# Altium PCB charging_device.PcbDoc (part 3 of 3)
Units mm, origin at the board's own origin, x right, y up, seen from the top; angles counter-clockwise.
Board outline 200.72 x 85.24 mm, 2 copper layers (Top Layer, Bottom Layer); 199 components, 123 nets, 612 pads, 55 vias.
Unrouted connection lines stored in the file: 5.
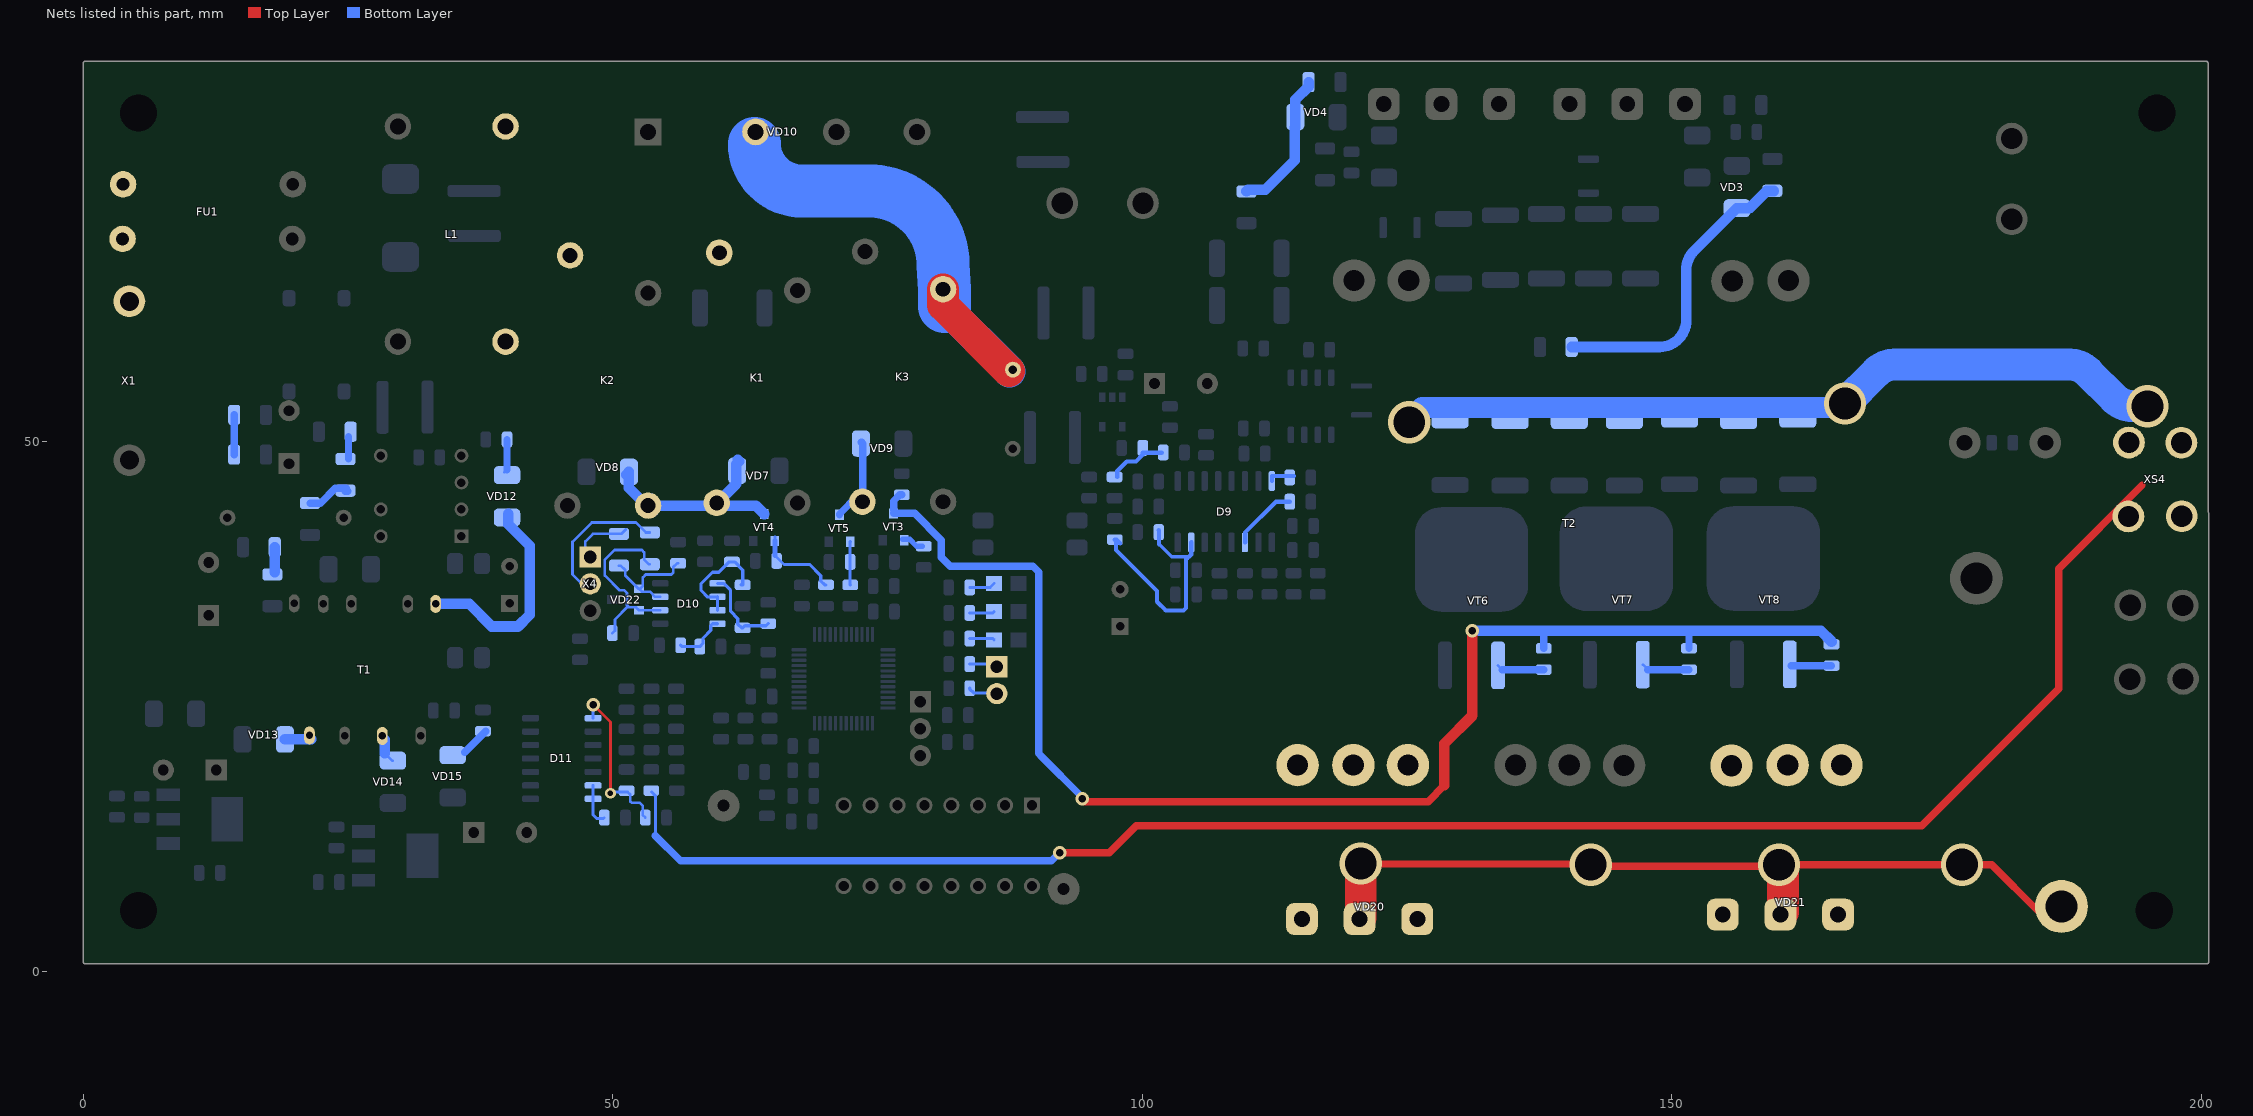
[diagram p3: the nets of this part, all layers, seen from the top]

## Via types
v1: diameter 1.27, hole 0.711, Top Layer to Bottom Layer, 36 vias
v2: diameter 4, hole 3, Top Layer to Bottom Layer, 15 vias
v3: diameter 1.016, hole 0.508, Top Layer to Bottom Layer, 2 vias
v4: diameter 4, hole 2, Top Layer to Bottom Layer, 1 vias
v5: diameter 2, hole 1, Top Layer to Bottom Layer, 1 vias

## Nets (pads, with @x,y where several pads share a name; then routed paths per layer and width w, separated by ;. In a path a pad name is that pad's centre, name@x,y a point inside that pad or via, vN(x,y) a via of type N, cw(c..) or ccw(c..) an arc to the next point about the centre after c; other vN are vias at no path point) (continued)
NetD9_8: D9.8 R71.1 | length 2.6
  Bottom Layer w0.4: D9.8@112.25,46.275 112.25,46.752 R71.1@114.333,46.752
NetD9_11: D9.11 R73.1 | length 6.4
  Bottom Layer w0.4: D9.11@109.71,40.475 109.728,40.493 109.728,41.402 112.649,44.323 R73.1@113.935,44.323
NetD9_15: D9.15 R66.1 R67.2 | length 22.2
  Bottom Layer w0.3: 101.598,40.314 102.796,39.116 104.403,39.116
  Bottom Layer w0.4: R66.1@97.939,40.372 97.575,40.736 R66.1@97.409,40.736 97.536,40.609 97.536,39.751 101.4,35.887 101.4,34.871 102.235,34.036 103.898,34.036 104.152,34.29 104.152,38.865 104.264,38.977 ; R67.2@101.569,41.628 101.598,41.599 101.598,40.314 ; 104.403,39.116 104.63,39.343 D9.15@104.63,40.475 D9.15@104.648,40.493
NetD10_1: D10.1 R28.2 R82.2 | length 8.2
  Bottom Layer w0.3: D10.1@59.892,36.609 60.469,36.609 61.129,35.949 61.129,33.967 61.813,33.283 61.813,32.766 62.177,32.402 R82.2@62.272,32.402 62.479,32.608 64.479,32.608 R28.2@64.685,32.815
NetD10_2: D10.2 D10.3 R26.2 R81.2 | length 10.4
  Bottom Layer w0.3: D10.3@59.892,34.069 D10.2@59.892,35.339 59.867,35.314 58.97,35.314 58.335,35.949 58.335,36.578 59.419,37.661 60.027,37.661 61.006,38.641 R81.2@61.256,38.641 61.506,38.641 62.288,37.859 62.288,36.482 R26.2@62.105,36.482
NetD10_4: D10.4 R27.2 R83.2 | length 5
  Bottom Layer w0.3: R83.2@56.414,30.767 56.541,30.64 R27.2@58.224,30.64 58.521,30.937 58.521,31.428 59.258,32.165 59.258,32.628 59.43,32.799 D10.4@59.892,32.799
NetD10_6: D10.6 R77.2 R78.2 VD22.2 | length 17.5
  Bottom Layer w0.254: R78.2@49.969,31.91 50.207,32.148 50.207,33.205 51.452,34.45 ; R77.2@53.509,38.411 53.41,38.411 52.974,38.847 52.974,39.529 52.747,39.756 50.165,39.756 49.257,38.848 49.257,37.357 50.665,35.949 51.096,35.949 51.35,35.695 51.35,34.552 51.452,34.45 ; D10.6@54.492,34.069 VD22.2@52.493,34.069 52.214,34.348 51.554,34.348 51.452,34.45
NetD10_7: D10.7 R79.1 R80.1 VD22.1 | length 10.9
  Bottom Layer w0.254: R79.1@50.588,38.284 50.754,38.284 51.19,37.848 51.19,37.328 52.417,36.101 VD22.1@52.493,36.101 ; D10.7@54.492,35.339 54.005,35.339 53.522,35.821 52.773,35.821 VD22.1@52.493,36.101 ; R80.1@56.176,38.505 56.081,38.505 55.717,38.141 55.717,37.624 55.549,37.455 53.12,37.455 52.849,37.183 52.849,36.38 52.569,36.101 VD22.1@52.493,36.101
NetD11_8: D11.8 R47.1 R50.2 | length 15.5
  Top Layer w0.254: v1(48.141,25.151) 49.784,23.508 v3(49.784,16.794)
  Bottom Layer w0.254: D11.8@48.141,23.881 v1(48.141,25.151) ; v3(49.784,16.794) 49.902,16.912 51.414,16.912 51.657,16.669 51.657,16.029 51.806,15.88 52.557,15.88 52.823,15.614 52.823,14.741 R47.1@53.081,14.483
NetD11_13: D11.13 D11.14 R44.1 | length 4
  Bottom Layer w0.254: D11.13@48.141,17.531 D11.14@48.141,16.261 48.141,14.759 48.493,14.407 49.132,14.407 R44.1@49.207,14.483
NetFU1_1: FU1.1 X1.1
NetK1_2: K1.2 L1.2
NetK2_2: K2.2 L1.3 | length 0.8
  Bottom Layer w0.254: K2.2@45.72,67.977 K2.2@46.545,67.977
NetK3_1: K3.1 VD9.1 VT5.3 | length 7.8
  Bottom Layer w0.7: VT5.3@71.416,43.086 71.416,43.162 73.078,44.824 73.596,45.342 73.596,45.355 73.596,49.816 73.485,49.927 VD9.1@73.517,49.927
NetK3_3: K3.3 R14.2 VD10.2 | length 49.2
  Top Layer w0.254: K3.3@81.198,64.389 ccw(c83.606,64.389) 81.904,62.686
  Top Layer w3: K3.3@81.198,64.389 81.198,62.884 R14.2@87.414,56.667
  Bottom Layer w3: 81.318,62.774 R14.2@87.477,56.616
  Bottom Layer w5: VD10.2@63.373,78.147 ccw(c67.86,78.147) 67.86,73.66 74.217,73.66 cw(c74.217,66.679) 81.198,66.679 81.318,64.395 81.318,62.774
NetL2_1: L2.1 VD20.2 VD21.2 | length 76.4
  Top Layer w0.254: VD20.2@120.534,4.913 VD20.2@120.65,5.029 ; v2(160.147,10.033) v2@160.528,9.652 ; VD21.2@160.274,5.331 VD21.2@160.528,5.585
  Top Layer w0.7: v2@120.704,10.106 v2@142.313,10.106 ; v2@142.513,9.906 v2@159.385,9.906 ; v2@160.264,10.043 171.694,10.043 v2@177.409,10.043 ; v2(177.419,10.052) 180.219,10.052 L2.1@184.556,5.715
  Top Layer w1.778: v2(120.65,10.16) v2@120.704,10.106 ; v2@142.313,10.106 v2(142.367,10.052) v2@142.513,9.906 ; v2@160.147,10.16 v2@160.264,10.043 ; v2@177.409,10.043 v2(177.419,10.052)
  Top Layer w3: VD20.2@120.65,5.029 v2(120.65,10.16) ; VD21.2@160.528,5.585 v2@160.528,9.652
  Bottom Layer w0.254: VD20.2@120.534,4.913 VD20.2@120.65,5.029 ; v2(160.147,10.033) 160.679,10.033 v2@160.933,9.779
NetR2_1: R2.1 R6.2 VD4.2 | length 13.7
  Bottom Layer w1: R2.1@109.855,73.625 109.998,73.768 111.617,73.768 114.413,76.564 114.413,79.628 114.464,79.679 VD4.2@114.464,80.645 114.464,82.276 115.721,83.533 R6.2@115.721,83.947
NetR3_1: R3.1 R5.2 VD3.2 | length 28.9
  Bottom Layer w1: R3.1@140.565,58.928 148.844,58.928 ccw(c148.844,61.468) 151.384,61.468 151.384,66.21 cw(c153.924,66.21) 152.128,68.006 VD3.2@156.163,72.041 157.353,72.041 158.972,73.66 R5.2@159.639,73.66
NetR15_1: R15.1 R16.2 | length 2.7
  Bottom Layer w0.254: R15.1@17.859,37.457 R15.1@18.089,37.687
  Bottom Layer w1: R15.1@18.089,37.687 R16.2@18.089,40.025
NetR17_1: R17.1 R18.2 | length 3.8
  Bottom Layer w0.7: R17.1@14.248,48.768 R18.2@14.248,52.527
NetR19_1: R19.1 R20.2 | length 2.1
  Bottom Layer w0.7: R20.2@25.049,48.395 R19.1@25.049,50.451
NetR20_1: R20.1 R21.2 | length 4.3
  Bottom Layer w0.7: R21.2@21.415,44.188 22.407,44.188 23.794,45.575 R20.1@24.844,45.575 ; R20.1@24.717,45.297 R20.1@24.995,45.297
NetR22_1: R22.1 VD12.1 | length 3.2
  Bottom Layer w0.254: VD12.1@39.781,47.117 VD12.1@40.019,47.355
  Bottom Layer w0.7: VD12.1@40.019,47.355 R22.1@40.019,50.197
NetR23_1: R23.1 VD15.1 | length 2.8
  Bottom Layer w0.7: VD15.1@36.014,20.648 R23.1@38.003,22.638
NetR29_2: R29.2 X2.1 | length 2.7
  Bottom Layer w0.3: R29.2@83.719,28.989 86.021,28.989 X2.1@86.275,28.735
NetR30_2: R30.2 X2.2 | length 2.8
  Bottom Layer w0.3: R30.2@83.719,26.703 83.719,26.626 84.083,26.262 86.208,26.262 X2.2@86.275,26.195
NetR33_1: R33.1 VD18.1 | length 2.4
  Bottom Layer w0.3: R33.1@83.719,33.815 85.894,33.815 VD18.1@86.021,33.942
NetR34_1: R34.1 VD19.1 | length 2.4
  Bottom Layer w0.3: R34.1@83.719,31.402 85.894,31.402 VD19.1@86.021,31.275
NetR35_1: R35.1 VD17.1 | length 2.5
  Bottom Layer w0.254: R35.1@83.719,36.228 85.64,36.228 VD17.1@86.021,36.609
NetR36_1: R36.1 R38.1 VT4.1 | length 8.1
  Bottom Layer w0.254: R38.1@65.32,39.24 66.169,38.391 68.606,38.391 ; VT4.1@65.32,40.622 VT4.1@65.32,41.021
  Bottom Layer w0.3: 68.606,38.391 69.65,37.347 69.65,36.83 70.014,36.466 R36.1@70.146,36.466
  Bottom Layer w0.5: R38.1@65.32,39.24 VT4.1@65.32,40.622
NetR37_2: R37.2 VT3.1 | length 2.2
  Bottom Layer w0.5: VT3.1@77.368,40.783 77.538,40.783 78.037,40.783 78.704,40.116 R37.2@79.248,40.116
NetR39_2: R39.2 R48.2 R49.2 R51.2 VT3.3 | length 130
  Top Layer w0.4: v1(94.361,16.256) v1@94.615,16.002
  Top Layer w0.7: v1@94.615,16.002 127,16.002 128.524,17.526
  Top Layer w1: 128.524,17.526 128.524,21.463 131.191,24.13 v1(131.191,32.131)
  Bottom Layer w0.254: 151.511,32.131 151.638,32.004
  Bottom Layer w0.7: VT3.3@76.522,43.213 78.509,43.213 81.026,40.696 81.026,39.08 81.864,38.243 89.69,38.243 90.249,37.684 90.249,20.574 ; VT3.3@76.522,43.492 76.522,44.384 77.111,44.974 R39.2@77.295,44.974 ; 90.424,20.32 94.361,16.383 v1(94.361,16.256) ; R48.2@137.922,30.464 137.922,32.131 ; R49.2@151.638,30.464 151.638,32.004
  Bottom Layer w1: v1(131.191,32.131) 137.922,32.131 151.511,32.131 164.084,32.131 R51.2@165.1,31.115
NetR41_1: R41.1 R42.1 VT5.1 | length 4.1
  Bottom Layer w0.3: R41.1@72.432,36.466 72.416,36.482 R42.1@72.416,38.641 72.416,40.53 VT5.1@72.432,40.546
NetR48_1: R48.1 VT6.1 | length 4.5
  Bottom Layer w0.254: VT6.1@133.608,28.862 VT6.1@134.005,28.464
  Bottom Layer w0.7: VT6.1@134.005,28.464 R48.1@137.922,28.464
NetR49_1: R49.1 VT7.1 | length 4.6
  Bottom Layer w0.254: VT7.1@147.28,28.937 VT7.1@147.753,28.464
  Bottom Layer w0.7: VT7.1@147.753,28.464 R49.1@151.638,28.464
NetR51_1: R51.1 VT8.1 | length 4
  Bottom Layer w0.254: VT8.1@161.163,28.956 VT8.1@161.274,28.845
  Bottom Layer w0.7: VT8.1@161.274,28.845 R51.1@165.1,28.845
NetR52_1: R52.1 R53.1 R54.1 R55.1 R56.1 R57.1 R58.1 R59.1 XS4.1 | length 241.5
  Top Layer w0.7: v1(92.202,11.176) 96.901,11.176 99.441,13.716 173.609,13.716 186.563,26.67 186.563,37.999 194.425,45.861
  Bottom Layer w0.254: v2(125.222,51.816) 125.222,52.001 125.672,52.451 v2@126.434,53.213 ; v2@165.989,53.213 v2(166.37,53.594) ; v2@193.584,53.34 v2(194.945,53.34)
  Bottom Layer w0.3: R59.1@53.652,16.912 53.662,16.912 54.025,16.548 54.025,12.791
  Bottom Layer w0.7: 54.025,12.791 56.402,10.414 91.44,10.414 v1(92.202,11.176)
  Bottom Layer w2: v2(125.222,51.816) 125.222,52.375 v2@125.595,52.748 ; v2@126.434,53.213 v2@165.989,53.213
  Bottom Layer w3: v2(166.37,53.594) 169.309,56.533 cw(c171.105,54.737) 171.105,57.277 187.579,57.277 cw(c187.579,54.824) 189.313,56.559 191.788,54.084 ccw(c193.584,55.88) v2@193.584,53.34
NetR62_1: R62.1 R63.2 R64.2 | length 5.6
  Bottom Layer w0.4: R62.1@97.646,46.656 97.646,47.213 98.548,48.116 99.406,48.116 100.045,48.755 100.045,48.938 R64.2@101.855,48.938
NetR77_1: R77.1 X4.2 | length 13.1
  Bottom Layer w0.254: X4.2@47.413,36.476 47.193,36.696 46.976,36.696 46.207,37.465 46.207,40.535 48.033,42.361 52.184,42.361 53.134,41.411 R77.1@53.509,41.411
NetR79_2: R79.2 X4.1 | length 5.9
  Bottom Layer w0.254: X4.1@47.413,39.016 47.413,40.562 48.135,41.284 R79.2@50.588,41.284 50.808,41.284 R79.2@51.243,41.72
NetT1_1: T1.1 VD12.2 | length 20.6
  Bottom Layer w1: T1.1@33.274,34.671 36.454,34.671 38.585,32.54 41.049,32.54 42.164,33.655 42.164,40.164 40.132,42.196 VD12.2@40.132,43.162
NetT1_7: T1.7 VD13.1 | length 2.5
  Bottom Layer w1: VD13.1@19.048,21.876 T1.7@21.519,21.876
NetT1_9: T1.9 VD14.1 | length 2.4
  Bottom Layer w0.254: T1.9@28.402,21.926 T1.9@28.472,21.856 ; VD14.1@28.472,20.564 29.172,19.864 VD14.1@29.24,19.864
  Bottom Layer w1: VD14.1@28.472,20.564 T1.9@28.472,21.856
NetT2_1:  | length 0.2
  Bottom Layer w0.254: 114.833,4.369 114.833,4.521
NetT2_2: T2.1 T2.2 T2.3 VD20.1 VD20.3
NetT2_9: T2.9 T2.10 T2.11 VD21.1 VD21.3
RELAY2: K1.1 K2.4 VD7.1 VD8.1 VT4.3 | length 22.8
  Top Layer w0.7: K2.4@53.709,44.54 K2.4@54.038,44.212
  Bottom Layer w0.254: K2.4@53.525,44.74 53.652,44.613 K2.4@53.911,44.355 ; K1.1@60.064,44.172 K1.1@60.064,44.437
  Bottom Layer w0.7: K1.1@60.064,44.172 K1.1@60.278,43.958
  Bottom Layer w1: VD8.1@51.272,46.874 VD8.1@51.53,47.133 51.53,45.625 53.498,43.657 53.799,43.356 53.799,43.958 59.621,43.958 59.968,44.304 60.1,44.437 61.662,45.998 61.662,47.851 61.96,48.149 VD7.1@61.813,48.295 ; K2.4@53.652,44.597 K2.4@53.652,44.613 ; K1.1@60.314,43.958 63.509,43.958 VT4.3@64.304,43.162
pads on no net: D3.3 D3.6 D5.4 D6.4 D7.2 D7.3 D7.4 D7.5 D7.6 D7.10 D7.14 D7.15 D7.20 D7.21 D7.22 D7.33 D7.35 D7.36 D11.5 D11.6 D11.7 T1.5 VD3. VD4. VD5. VD6. VD7. VD8. VD9. VD11. VD12. VD13. VD14. VD15. VD16. VD20. VD21. VT1. VT2. VT6. VT7. VT8. X1.2

## Polygon pours and split planes (outlines as drawn)
NetC44_2 on Top Layer "NETC44_2_L01_P126" (solid, pour order 126): 134.617,39.384 154.092,39.384 ccw(c154.092,61.078) 168.034,44.457 ccw(c161.297,51.195) 170.51,48.767 cw(c181.131,45.968) 171.402,51.066 cw(c175.814,48.754) 175.814,53.735 cw(c175.814,50.756) 177.92,52.862 178.694,52.089 cw(c176.819,50.213) 179.471,50.213 cw(c173.671,50.576) 177.78,46.466 ccw(c183.84,40.406) 175.27,40.406 175.27,26.6 cw(c171.56,26.6) 173.99,23.796 cw(c172.538,25.471) 172.538,23.255 127.162,23.255 cw(c126.468,26.379) 124.179,24.142 cw(c126.396,26.308) 124.381,28.663 126.405,30.395 ccw(c123.87,33.358) 127.742,32.896 cw(c135.064,32.024)
NetR52_1 on Top Layer "NETR52_1_L01_P124" (solid, pour order 124): 125.73,53.594 160.825,53.594 ccw(c160.825,59.009) 164.654,55.18 cw(c166.406,53.428) 166.406,55.906 cw(c166.406,53.421) 168.163,51.665 cw(c151.665,68.162) 151.665,44.831 131.287,44.831 cw(c131.287,53.381) 125.241,47.335 cw(c129.273,51.367) 123.571,51.367 cw(c125.771,51.367) 125.389,53.534
NetR52_1 on Top Layer "NETR52_1_L01_P122" (solid, pour order 122): 191.77,49.022 191.77,52.426 cw(c194.97,52.426) 194.97,55.626 195.426,55.626 cw(c195.426,49.123) 197.352,55.334 cw(c196.228,51.707) 200.025,51.707 200.025,41.634 cw(c198.015,41.634) 198.015,39.624 193.798,39.624 cw(c193.798,43.303) 190.119,43.303 190.119,45.036 cw(c195.756,45.036)
NetK1_2 on Top Layer "NETK1_2_L01_P106" (solid, pour order 106): 41.944,83.121 ccw(c40.137,79.735) 39.175,83.451 ccw(c40.233,79.359) 36.006,79.359 ccw(c43.376,79.359) 38.165,74.147 ccw(c41.845,77.828) 41.845,72.623 44.325,72.623 cw(c44.326,62.661) 49.604,71.11 ccw(c60.875,89.15) 53.187,69.316 55.302,68.497 cw(c54.687,66.909) 55.608,68.341 57.595,67.063 cw(c56.15,64.815) 57.797,66.92 ccw(c61.238,71.321) 59.731,65.941 ccw(c60.235,67.741) 62.1,67.628 62.12,67.963 ccw(c61.973,68.158) 62.168,68.305 62.168,68.718 ccw(c56.241,68.72) 62.12,69.474 ccw(c57.483,68.881) 58.724,73.388 ccw(c53.729,55.248) 54.519,74.047 cw(c54.89,82.851) 51.497,74.719 ccw(c20.947,1.55) 50.448,75.148 cw(c51.689,78.24) 49.679,75.583 cw(c59.671,88.791) 46.588,78.636 ccw(c28.663,64.724)
NetFU1_1 on Top Layer "NETFU1_1_L01_P104" (solid, pour order 104): 1.27,76.104 ccw(c2.19,75.184) 0.889,75.184 0.889,63.669 ccw(c4.595,63.669) 1.974,61.049 ccw(c3.033,62.107) 3.033,60.61 ccw(c3.033,64.25) 5.607,61.676 ccw(c-1.092,68.375) 8.382,68.375 8.382,73.183 ccw(c5.207,73.183) 5.777,76.306 4.494,76.54 ccw(c3.552,71.373)
NetK2_2 on Top Layer "NETK2_2_L01_P100" (solid, pour order 100): 45.659,69.386 cw(c46.21,68.097) 47.202,69.088 cw(c44.936,66.822) 48.141,66.821 cw(c36.674,69.263) 46.625,63.065 44.35,59.411 cw(c40.548,61.778) 42.144,57.593 cw(c40.785,64.504) 40.126,57.492 cw(c40.369,60.08) 38.354,61.722 cw(c42.58,59.49) 39.479,63.126 ccw(c28.439,76.07) 42.83,66.998 ccw(c42.649,67.228) 42.848,67.014 43.307,67.58 ccw(c42.775,68.67) 43.892,68.196 cw(c45.215,67.633) 44.705,68.977
NetC4_1 on Top Layer "NETC4_1_L01_P096" (solid, pour order 96): 20.448,63.5 ccw(c20.448,46.941) 8.739,58.65 6.991,57.123 ccw(c7.291,56.649) 6.868,57.018 cw(c-19.139,79.929) 5.371,55.424 3.112,53.164 ccw(c6.602,48.755) 1.016,49.403 ccw(c4.84,48.447) 1.46,46.419 ccw(c5.235,51.412) 3.961,45.283 ccw(c5.902,54.622) 7.749,45.264 ccw(c6.989,49.114) 9.763,46.339 10.917,47.493 ccw(c4.505,55.281) 11.769,48.281 cw(c32.969,40.562) 14.999,54.204 16.781,56.551 cw(c19.046,54.831) 19.203,57.671 ccw(c24.313,150.664) 24.303,57.531 29.122,57.531 ccw(c29.122,59.97) 31.16,58.631 cw(c118.087,1.529) 36.292,65.767 ccw(c34.079,67.506) 34.776,70.233 ccw(c33.998,67.189) 31.569,69.181 ccw(c35.654,64.139) 30.665,68.29 cw(c20.449,76.791)
"+ 310V PWR" on Top Layer "+_310V_PWR_L01_P086" (solid, pour order 86): 182.863,83.629 ccw(c183.212,78.04) 182.177,83.544 cw(c167.851,159.816) 169.596,82.23 ccw(c169.695,77.83) 166.583,80.942 ccw(c169.653,77.872) 165.311,77.871 ccw(c168.407,77.871) 166.218,75.682 ccw(c168.855,78.319) 168.855,74.59 169.043,74.59 ccw(c169.043,81.908) 170.18,74.679 173.008,75.124 ccw(c172.959,75.434) 173.047,75.133 cw(c192.514,8.659) 181.62,77.062 cw(c186.762,44.783) 183.798,77.335 ccw(c183.632,79.163) 185.131,78.102 ccw(c180.478,81.397) 186.179,81.361 ccw(c183.954,81.375) 184.25,83.58 ccw(c183.308,76.566)
NetC3_1 on Top Layer "NETC3_1_L01_P074" (solid, pour order 74): 117.729,64.884 ccw(c119.967,65.785) 119.967,63.373 127.804,63.373 ccw(c127.804,76.28) 130.2,63.597 137.013,64.884 ccw(c131.028,96.568) 140.06,65.615 145.809,67.292 ccw(c140.017,87.144) 150.942,69.586 152.979,70.853 ccw(c150.415,74.974) 154.735,72.761 ccw(c154.03,73.122) 154.821,73.089 ccw(c9.433,79.275) 154.94,77.33 154.819,79.208 ccw(c149.766,79.232) 152.618,83.403 ccw(c152.111,82.661) 152.372,83.522 151.49,83.79 ccw(c151.134,82.616) 150.194,83.403 ccw(c152.542,81.437) 149.479,81.437 149.479,77.47 cw(c146.125,77.97) 148.141,75.243 147.837,74.939 cw(c144.354,80.063) 143.192,73.977 ccw(c141.122,63.152) 141.511,74.167 136.629,75.07 ccw(c119.514,25.182) 132.442,76.316 cw(c135.567,80.709) 130.175,80.709 130.078,82.429 ccw(c128.476,82.528) 129.516,83.751 ccw(c128.683,82.774) 128.574,84.053 127.61,83.972 ccw(c127.539,82.803) 126.37,82.732 ccw(c128.132,82.593) 126.365,82.55 126.111,80.728 cw(c122.847,80.727) 125.154,78.418 123.279,76.543 ccw(c133.861,64.355)
NetC12_2 on Top Layer "NETC12_2_L01_P064" (solid, pour order 64): 185.409,70.023 cw(c189.411,70.473) 185.392,70.209 ccw(c183.84,70.104) 185.19,70.878 ccw(c182.288,69.218) 182.31,72.562 ccw(c182.273,67.434) 181.491,72.502 cw(c174.996,114.882) 177.421,72.076 ccw(c182.338,-14.66) 163.958,70.248 ccw(c177.837,6.13) 144.787,62.8 cw(c137.828,74.734) 137.827,60.919 ccw(c137.827,-2318.88) 120.307,60.855 cw(c120.248,68.94) 117.083,61.499 cw(c121.427,71.714) 113.371,64.079 109.759,67.89 cw(c120.246,77.828) 108.839,68.961 104.442,73.563 ccw(c101.301,70.562) 99.248,74.391 ccw(c100.96,73.013) 98.763,72.964 98.796,71.474 ccw(c100.249,71.507) 99.103,70.612 ccw(c138.782,101.577) 103.651,65.535 ccw(c122.164,76.454) 122.392,54.962 cw(c126.707,-350.837) 134.843,54.904 ccw(c136.384,131.727) 148.847,55.906 ccw(c63.882,572.781) 169.792,59.788 ccw(c164.555,84.436) 173.606,60.919 175.818,61.65 cw(c178.342,54.984) 177.146,62.011 ccw(c176.875,64.544) 177.783,62.164 180.813,63.319 ccw(c178.269,69.991)
"GND  PWR" on Top Layer "GND__PWR_L01_P058" (solid, pour order 58): 112.82,49.016 ccw(c126.117,55.933) 114.8,46.105 cw(c100.515,33.698) 117.985,40.965 cw(c108.418,36.981) 118.782,36.978 118.782,36.625 cw(c113.375,36.621) 117.387,32.996 cw(c102.032,46.843) 110.146,27.825 102.336,26.858 cw(c102.335,28.127) 101.066,28.128 101.066,32.632 ccw(c98.744,32.63) 98.756,34.952 cw(c98.319,40.435) 92.821,40.253 92.756,44.212 92.756,49.884 92.812,50.43 92.882,50.67 93.524,52.601 ccw(c85.301,56.957) 94.54,55.843 ccw(c65.054,58.359) 94.645,57.99 cw(c95.089,57.985) 94.645,58.007 94.815,61.498 ccw(c89.841,61.742) 94.249,64.06 ccw(c71.832,52.291) 88.614,71.248 85.637,74.226 cw(c145.096,164.392) 83.016,76.01 ccw(c80.386,72.275) 81.606,76.677 80,77.125 ccw(c79.197,74.297) 79.576,77.212 cw(c80.08,80.94) 76.865,78.987 cw(c78.656,79.086) 79.021,80.841 ccw(c91.06,138.622) 83.847,80.043 cw(c81.775,72.604) 86.483,78.725 cw(c76.285,58.196) 95.129,71.248 ccw(c107.984,79.349) 95.637,70.493 99.205,65.522 ccw(c105.123,69.771) 100.145,64.452 cw(c79.715,43.306) 103.065,61.174 cw(c96.645,54.379) 104.796,58.958 ccw(c105.586,59.403) 104.928,58.778 cw(c99.198,53.333) 106.354,56.69 ccw(c106.842,56.922) 106.369,56.662 106.824,55.84 ccw(c107.25,56.077) 106.858,55.788 107.247,55.263 ccw(c107.46,55.422) 107.261,55.246 cw(c78.912,29.714) 108.515,53.781 ccw(c109.107,54.264) 108.663,53.643
GND on Top Layer "GND_L01_P062" (solid, remove dead copper, pour order 62): 46.147,41.989 ccw(c46.147,40.812) 44.972,40.878 cw(c44.479,40.904) 44.965,40.816 ccw(c53.428,38.854) 44.741,38.854 44.741,32.865 cw(c42.476,32.865) 42.718,30.612 ccw(c42.962,28.33) 42.451,30.568 35.542,28.988 ccw(c36.865,23.201) 35.809,17.359 cw(c34.455,9.873) 40.878,13.95 41.629,12.767 ccw(c49.049,12.767) 43.057,8.39 ccw(c45.032,9.833) 45.032,7.387 87.518,7.387 ccw(c87.518,12.03) 89.35,7.764 ccw(c88.46,9.836) 90.715,9.836 90.715,22.59 ccw(c62.362,22.591) 88.985,32.344 cw(c101.482,36.921) 88.783,32.939 cw(c105.054,40.839) 87.278,37.494 ccw(c81.666,36.834) 84.41,41.774 ccw(c82.785,35.738) 82.783,41.989
NetC2_2 on Top Layer "NETC2_2_L01_P056" (solid, pour order 56): 18.954,54.006 19.431,54.229 cw(c20.045,52.41) 21.113,54.006 cw(c20.256,51.071) 22.376,53.274 23.246,52.665 ccw(c25.971,56.557) 25.839,51.808 28.023,51.747 ccw(c28.26,60.263) 29.931,51.909 ccw(c29.385,54.647) 29.966,51.917 cw(c32.454,40.173) 35.451,51.797 36.279,51.584 cw(c35.397,48.602) 38.13,50.085 38.13,37.502 cw(c35.609,37.502) 36.99,35.393 cw(c33.738,39.04) 30.614,35.283 cw(c32.422,36.04) 30.697,36.97 cw(c37.493,33.307) 31.344,37.975 ccw(c28.644,40.026) 32.034,40.026 32.034,43.085 32.034,44.609 ccw(c29.343,44.331) 29.621,47.022 27.833,47.207 cw(c28.541,54.048) 24.414,48.546 ccw(c18.772,42.184) 23.223,49.429 20.796,50.325 cw(c21.242,53.153) 18.954,51.432 cw(c20.292,52.924) 18.288,52.959 cw(c19.821,52.719)
NetC44_2 on Bottom Layer "NETC44_2_L02_P120" (solid, pour order 120): 129.217,28.842 ccw(c129.216,24.135) 125.888,27.463 125.159,26.734 ccw(c126.696,25.197) 125.595,23.324 ccw(c129.164,29.395) 127.942,22.459 cw(c127.571,20.351) 128.578,22.24 129.492,21.752 ccw(c137.536,36.842) 130.585,21.219 cw(c129.108,17.898) 132.68,18.573 ccw(c135.628,19.13) 135.628,16.129 146.055,16.129 ccw(c146.055,19.183) 148.215,17.024 ccw(c145.469,19.77) 149.352,19.77 cw(c152.916,19.77) 153.154,23.325 ccw(c153.515,28.729) 154.543,23.412 155.85,23.664 ccw(c155.409,25.947) 157.734,25.947 157.734,26.293 ccw(c154.63,26.294) 157.169,28.079 ccw(c156.379,27.524) 156.379,28.49 156.087,28.49 ccw(c156.087,24.889) 153.54,27.435 153.419,27.313 cw(c151.414,29.315) 153.236,27.145 cw(c151.544,29.157) 151.704,26.533 ccw(c152.031,21.165) 149.529,25.925 cw(c147.916,28.994) 147.915,25.527 144.789,25.527 cw(c144.789,26.775) 143.906,25.893 cw(c145.17,27.156) 143.383,27.156 143.383,27.635 ccw(c141.82,27.635) 143.129,28.49 ccw(c142.9,28.228) 142.875,28.575 142.588,28.575 141.741,28.575 ccw(c141.74,28.429) 141.597,28.4 cw(c141.326,28.346) 141.444,28.097 ccw(c145.314,19.898) 138.903,26.308 138.66,26.065 cw(c137.308,27.417) 137.361,25.506 133.608,25.4 cw(c133.247,27.214) 131.639,26.3 ccw(c118.427,18.8) 130.316,28.259 ccw(c129.218,27.516)
NetL2_1 on Bottom Layer "NETL2_1_L02_P112" (solid, pour order 112): 177.723,12.954 cw(c180.492,0.569) 188.214,10.64 189.992,8.382 cw(c185.42,6.539) 186.055,1.651 184.785,1.651 177.161,1.651 cw(c177.161,5.33) 173.482,5.33 173.482,9.414 cw(c176.99,9.414) 176.853,12.92
NetC44_1 on Bottom Layer "NETC44_1_L02_P110" (solid, pour order 110): 182.199,51.191 182.199,48.337 cw(c180.386,48.337) 181.553,46.948 ccw(c273.202,-61.983) 176.658,42.635 ccw(c185.321,33.248) 172.547,33.247 ccw(c175.361,33.247) 173.372,31.257 ccw(c182.953,40.839) 182.953,27.288 194.278,25.493 ccw(c196.211,37.685) 198.811,25.618 ccw(c198.594,26.625) 199.549,26.241 cw(c200.795,25.741) 199.588,26.328 ccw(c196.439,27.861) 199.888,27.25 ccw(c199.366,27.03) 199.88,27.267 cw(c200.199,27.328) 199.891,27.432 cw(c200.221,27.486) 199.908,27.601 cw(c203.086,28.033) 199.891,28.321 cw(c202.029,28.963) 199.816,29.249 199.891,29.835 199.568,32.025 cw(c228.064,32.215) 199.62,33.946 199.652,34.624 ccw(c196.543,34.77) 199.62,35.235 ccw(c198.935,35.133) 199.412,35.635 ccw(c197.182,33.287) 197.147,36.525 cw(c195.185,219.284) 194.793,36.515 cw(c194.797,38.545) 193.657,36.865 ccw(c186.112,25.754) 191.811,37.916 cw(c198.401,44.506) 189.775,48.035 ccw(c181.244,47.336) 188.182,52.348 ccw(c186.713,51.288) 186.861,53.094 185.843,53.178 ccw(c185.437,49.588)
no net on Bottom Layer "NONET_L02_P108" (solid, pour order 108): 41.955,83.147 ccw(c40.148,79.762) 39.186,83.477 ccw(c39.888,80.76) 38.048,78.641 ccw(c39.698,79.802) 39.186,77.851 ccw(c291.952,458.973) 49.616,71.136 ccw(c60.88,89.163) 53.199,69.342 55.314,68.522 cw(c54.702,66.941) 55.62,68.367 57.606,67.089 cw(c56.187,64.876) 57.808,66.946 ccw(c61.249,71.347) 59.742,65.967 ccw(c60.246,67.767) 62.111,67.654 62.132,67.989 ccw(c61.985,68.184) 62.18,68.331 62.18,68.744 ccw(c56.27,68.747) 62.132,69.5 ccw(c57.495,68.907) 58.735,73.414 ccw(c53.741,55.28) 54.531,74.073 cw(c54.901,82.876) 51.508,74.745 ccw(c21.572,3.078) 50.46,75.174 cw(c51.701,78.267) 49.69,75.609 cw(c59.683,88.817) 46.599,78.662 ccw(c28.677,64.752)
NetFU1_1 on Bottom Layer "NETFU1_1_L02_P102" (solid, pour order 102): 1.27,76.073 ccw(c2.19,75.153) 0.889,75.153 0.889,63.638 ccw(c4.595,63.638) 1.974,61.018 ccw(c3.033,62.076) 3.033,60.579 ccw(c3.033,64.219) 5.607,61.645 ccw(c-1.092,68.344) 8.382,68.344 8.382,73.152 ccw(c5.207,73.152) 5.777,76.275 4.494,76.509 ccw(c3.552,71.342)
NetC4_2 on Bottom Layer "NETC4_2_L02_P098" (solid, pour order 98): 29.095,82.249 cw(c26.61,88.178) 27.765,81.853 21.531,80.715 cw(c20.103,88.534) 19.769,80.593 ccw(c19.655,77.875) 17.653,79.716 ccw(c25.452,74.38) 16.002,74.38 16.002,71 ccw(c19.999,70.999) 19.04,67.119 ccw(c20.601,73.434) 20.601,66.929 20.687,66.929 ccw(c20.687,70.643) 23.313,68.017 ccw(c19.194,72.135) 24.436,69.595 cw(c28.491,67.629) 28.491,72.136 38.584,72.136 ccw(c38.584,73.307) 39.729,73.551 cw(c39.729,73.057) 39.841,73.539 cw(c39.831,73.643) 39.729,73.619 ccw(c38.632,73.571) 38.547,74.665 cw(c38.355,75.993) 37.376,75.076 33.713,78.99 cw(c37.802,82.818) 33.418,79.331 cw(c52.997,94.91) 31.916,81.432 ccw(c30.09,80.265) 30.515,82.391 ccw(c30.037,80.003)
NetC12_2 on Bottom Layer "NETC12_2_L02_P094" (solid, pour order 94): 183.388,72.136 177.077,70.493 cw(c175.708,75.752) 176.4,70.362 156.327,67.788 ccw(c156.938,63.027) 154.658,67.251 ccw(c155.54,65.617) 153.702,65.344 153.926,63.836 ccw(c155.332,64.045) 154.855,62.706 155.476,62.484 ccw(c157.477,73.875) 158.632,62.368 173.984,63.909 ccw(c171.454,89.103) 184.487,67.394 ccw(c182.555,70.612) 185.37,68.129 ccw(c183.435,69.836) 185.26,71.661 ccw(c184.311,70.712) 184.422,72.05
NetC3_1 on Bottom Layer "NETC3_1_L02_P092" (solid, pour order 92): 151.095,81.447 151.384,79.812 151.384,78.866 155.378,78.866 155.575,78.669 155.575,82.804 152.284,83.028 ccw(c152.204,81.851)
"GND  PWR" on Bottom Layer "GND__PWR_L02_P090" (solid, pour order 90): 107.696,68.58 107.481,68.795 105.791,68.795 105.791,68.723 104.531,67.463 cw(c103.242,68.752) 103.242,66.929 102.1,66.929 cw(c102.1,75.4) 98.545,67.711 92.173,74.435 ccw(c90.71,72.972) 90.709,75.042 90.251,75.042 ccw(c90.25,72.944) 88.248,73.569 ccw(c91.148,72.664) 89.141,70.383 cw(c88.509,69.664) 89.238,70.286 ccw(c181.761,149.447) 95.659,63.345 ccw(c101.95,69.636) 101.95,60.739 107.688,60.739
NetC7_2 on Bottom Layer "NETC7_2_L02_P088" (solid, pour order 88): 123.698,83.82 122.555,84.963 119.347,84.963 ccw(c119.347,84.222) 118.606,84.222 118.606,81.973 cw(c114.128,82.615) 117.209,79.303 ccw(c118.633,77.772) 116.653,78.442 ccw(c117.168,78.268) 117.042,77.74 ccw(c117.299,78.818) 117.299,77.709 122.327,77.709 ccw(c122.327,79.461) 124.079,79.461 124.079,83.312
"+ 310V PWR" on Bottom Layer "+_310V_PWR_L02_P084" (solid, pour order 84): 182.782,83.801 ccw(c183.132,78.212) 182.097,83.715 cw(c167.771,159.987) 169.516,82.401 ccw(c169.615,78.002) 166.503,81.113 ccw(c169.573,78.043) 165.231,78.043 ccw(c168.327,78.043) 166.138,75.854 ccw(c168.775,78.491) 168.775,74.762 168.962,74.762 ccw(c168.962,82.08) 170.1,74.85 172.928,75.295 ccw(c172.879,75.606) 172.967,75.304 cw(c192.434,8.831) 181.54,77.234 cw(c186.682,44.954) 183.718,77.506 ccw(c183.552,79.335) 185.05,78.274 ccw(c180.398,81.569) 186.099,81.532 ccw(c183.874,81.547) 184.17,83.752 ccw(c183.228,76.737)
"+ 310V PWR" on Bottom Layer "+_310V_PWR_L02_P082" (solid, pour order 82): 145.161,79.248 cw(c142.117,82.343) 143.058,78.105 141.605,77.851 ccw(c141.694,77.254) 141.097,77.164 141.097,76.917 ccw(c141.978,76.917) 141.355,76.294 ccw(c141.659,76.597) 141.659,76.168 145.788,76.168 ccw(c145.788,76.938) 146.54,76.77 146.636,77.202 ccw(c144.636,77.648) 146.641,78.07 146.537,78.565 ccw(c145.58,78.364)
NetC7_1 on Bottom Layer "NETC7_1_L02_P080" (solid, pour order 80): 112.679,60.734 cw(c114.457,64.961) 112.153,60.996 cw(c112.658,61.865) 111.653,61.865 111.653,69.324 cw(c116.937,69.028) 116.484,74.301 119.95,74.598 ccw(c107.765,117.493) 129.791,78.721 ccw(c128.242,81.691) 131.592,81.691 131.592,83.593 132.503,84.504 135.58,84.504 135.58,84.486 136.291,83.775 136.291,82.438 cw(c128.731,82.437) 134.076,77.091 133.624,76.639 133.624,76.574 cw(c126.681,84.034) 129.326,74.192 123.451,71.68 ccw(c123.923,70.577) 122.726,70.479 cw(c121.92,70.413) 122.17,69.643 cw(c120.462,74.907) 120.274,69.376 ccw(c119.936,59.474) 119.094,69.346 ccw(c119.385,65.939) 117.101,68.484 ccw(c121.992,63.029) 114.828,64.565 114.397,61.533 cw(c113.121,62.031)
NetC10_1 on Bottom Layer "NETC10_1_L02_P078" (solid, pour order 78): 149.225,72.068 149.225,72.517 cw(c150.335,73.627) 148.91,72.968 ccw(c148.209,72.644) 148.082,73.406 144.907,73.406 ccw(c120.961,-204.039) 140.259,73.768 ccw(c137.294,53.838) 134.329,73.768 ccw(c136.989,53.446) 128.27,71.994 cw(c127.397,73.403) 127.792,71.793 126.492,71.247 ccw(c126.691,70.371) 126.492,69.495 128.472,69.84 cw(c131.648,51.649) 132.933,70.071 ccw(c137.074,129.428) 146.292,70.645 ccw(c146.819,73.362) 149.224,71.994 ccw(c146.548,72.041)
NetC3_1 on Bottom Layer "NETC3_1_L02_P076" (solid, pour order 76): 120.718,67.549 146.72,67.423 cw(c146.502,64.958) 147.38,67.272 cw(c146.624,65.279) 148.711,64.849 ccw(c153.079,63.948) 148.642,64.391 cw(c146.694,64.585) 147.046,62.66 cw(c140.908,96.275) 140.908,62.104 122.533,62.104 cw(c122.533,68.892) 119.176,62.992 cw(c120.519,65.118) 118.4,66.471 ccw(c117.915,66.963) 118.437,66.512 cw(c120.718,64.524)
NetT2_2 on Bottom Layer "NETT2_2_L02_P060" (solid, pour order 60): 124.092,4.237 ccw(c126.22,5.019) 127.952,3.556 ccw(c118.762,7.611) 128.778,8.382 128.778,18.22 ccw(c125.359,18.22) 127.517,20.872 ccw(c124.536,17.359) 124.333,21.962 cw(c122.174,70.805) 120.015,21.962 cw(c117.99,55.205) 115.965,21.962 ccw(c115.433,17.612) 113.041,21.283 ccw(c114.252,19.425) 112.034,19.424 112.034,5.851 ccw(c116.248,5.851) 112.812,3.412 ccw(c114.942,4.924) 117.551,4.806 117.551,10.27 cw(c124.798,10.27) 117.747,11.942 118.048,12.39 cw(c119.075,11.699) 119.075,12.937 122.631,12.937 cw(c122.632,11.477) 124.092,11.476
NetT2_9 on Bottom Layer "NETT2_9_L02_P026" (solid, pour order 26): 163.258,4.763 163.627,3.573 ccw(c165.422,5.552) 165.956,2.934 ccw(c165.994,5.462) 168.011,3.937 ccw(c153.259,8.029) 168.561,8.492 cw(c168.745,8.499) 168.561,8.507 cw(c249.977,7.578) 168.918,15.253 cw(c237.244,17.521) 168.89,18.684 ccw(c165.863,18.862) 165.956,21.893 ccw(c165.465,16.694) 164.973,21.893 156.718,21.893 ccw(c156.422,16.679) 151.2,16.679 151.2,6.377 ccw(c155.414,6.376) 151.978,3.937 ccw(c154.108,5.449) 156.718,5.331 156.718,10.795 cw(c163.964,10.795) 156.914,12.468 157.215,12.915 cw(c158.242,12.224) 158.242,13.462 161.798,13.462 cw(c161.798,12.002) 163.258,12.002
no net on Bottom Layer "NONET_L02_P042" (solid, pour order 42): 165.354,125.527
GND on Bottom Layer "GND_L02_P030" (solid, pour order 30): 164.084,41.618 126.79,41.327 126.79,45.285 127.277,45.772 157.905,45.772 163.703,45.772 164.084,44.577

## Other copper
Bottom Layer:
  text "\"- OUT\"" at 191.135,57.023 h3
  text "\"+ OUT\"" at 190.754,20.066 h3

## Silkscreen, mask and mechanical layers (free items; w line width, h text height)
Mechanical 1:
  lines w0.381: 0.191,0.867 200.533,0.867 ; 0.191,1.016 0.191,85.725 200.473,85.725 200.534,0.889

## Text inside footprints (layer, text, board x,y; h text height)
C12: Top Overlay "+" at 180.848,81.915 h2.47 r270
C13: Top Overlay "+" at 103.378,73.773 h2.47 r180
C44: Top Overlay "+" at 188.595,51.156 h2.47 r180
FU1: Top Overlay "~" at 12.202,71.293 h2.4 r90
VD2: Bottom Overlay "~~" at 18.438,62.303 h2.47 r180; Bottom Overlay "~~" at 23.738,62.303 h2.47 r180; Bottom Overlay "-" at 18.703,58.503 h2.47 r180; Bottom Overlay "+" at 23.738,58.503 h2.47 r180